# Altium PCB ISL6236A_DEMO_PCB_V1I1.PcbDoc (part 3 of 3)
Units mm, origin at the board's own origin, x right, y up, seen from the top; angles counter-clockwise.
Board outline 50 x 50 mm, 6 copper layers (L1, L2, L3, L4, L5, L6), stack 0.816 mm thick; 41 components, 27 nets, 119 pads, 41 vias.
Unrouted connection lines stored in the file: 91.
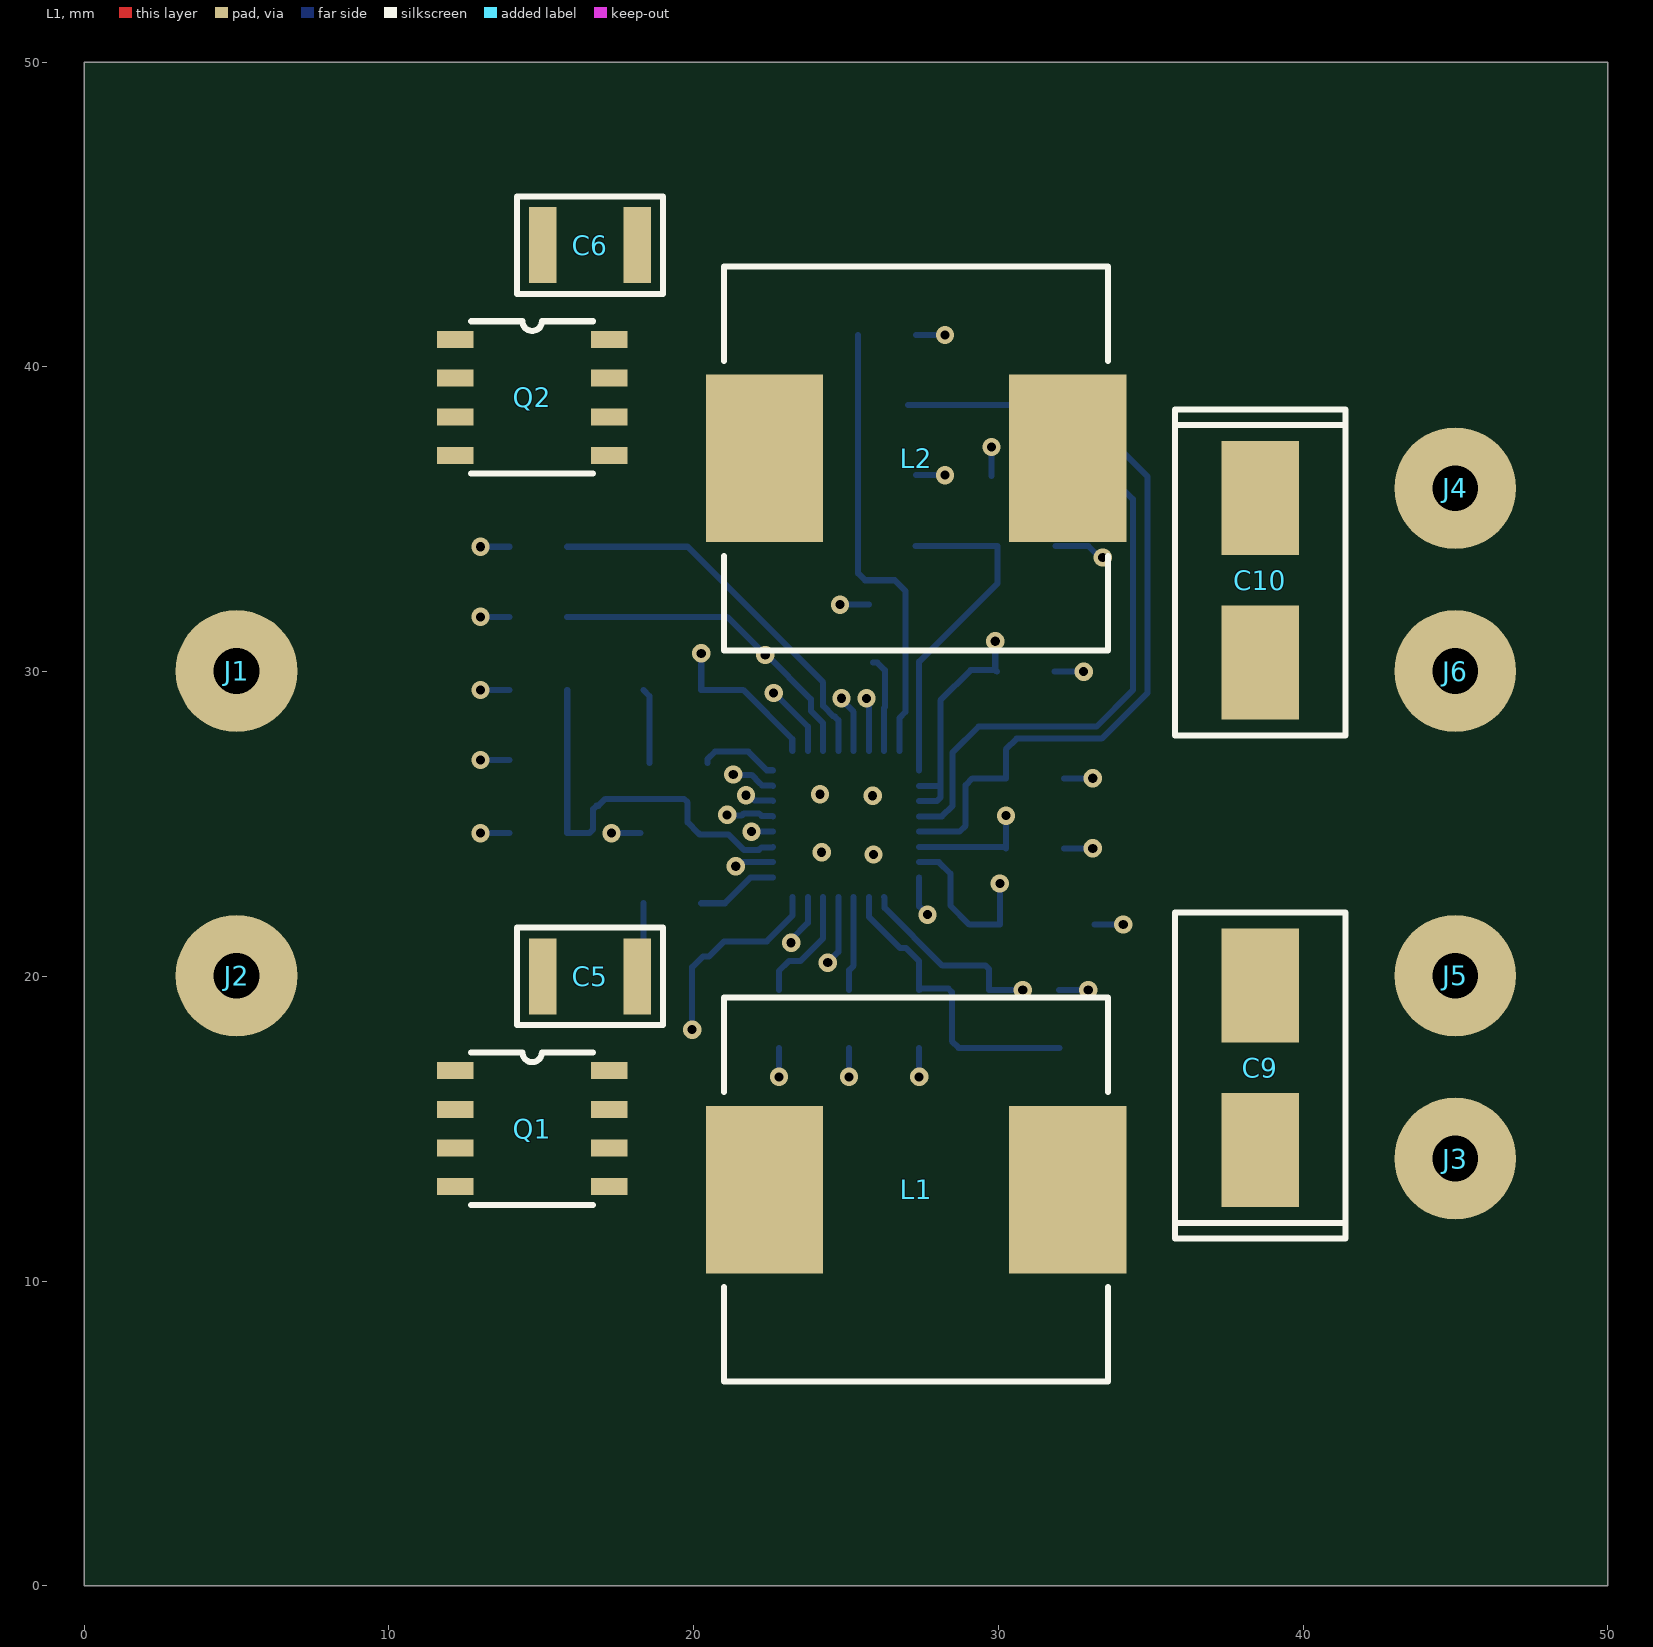
[diagram p0: L1 view]

## Via types
v1: diameter 0.6, hole 0.3, L1 to L6, tented both sides, 41 vias

## Nets (pads, with @x,y where several pads share a name; then routed paths per layer and width w, separated by ;. In a path a pad name is that pad's centre, name@x,y a point inside that pad or via, vN(x,y) a via of type N, cw(c..) or ccw(c..) an arc to the next point about the centre after c; other vN are vias at no path point) (continued)
+5V_VCC: (continued)
  L6 w0.2: v1(13,29.4) R3.2 ; v1(13,31.8) R10.2 ; v1(13,34.1) R9.2 ; v1(21.895,24.75) U1.20 ; v1(22.8,16.7) R11.2 ; R16.2 v1(28.25,36.45) ; v1(27.4,16.7) R13.2 ; U1.3 27.983,25.75 28.1,25.867 28.1,26.25 ; U1.2 28.1,26.25 ; R8.2 v1(29.775,37.375) ; v1(29.9,31) C4.1@29.9,30.05 ; C4.1 C4.1@29.9,30.05 ; 28.1,26.25 28.1,29.059 29.091,30.05 C4.1@29.9,30.05
+REF: C12.1 R14.2 U1.1 | length 11.1
  L6 w0.2: R14.2@27.275,34.125 C12.1 29.975,32.9 27.4,30.325 U1.1
+VIN: C2.1 C5.2 C6.2 J1.1 Q1.8 Q2.8 R2.1 U1.6 | length 4.9
  L6 w0.2: v1(13,27.1) R2.1 ; U1.6 30.2,24.25 C2.1 v1(30.25,25.275)
+VREF3: C11.1 R15.2 U1.5 | length 26.6
  L6 w0.2: R15.2@27.042,38.75 32.55,38.75 34.9,36.4 34.9,29.309 33.391,27.8 30.6,27.8 30.25,27.45 C11.1 29.15,26.5 28.925,26.275 28.925,24.95 28.725,24.75 U1.5
EN_1: R11.1 U1.14 | length 3.9
  L6 w0.2: R11.1 22.8,20.175 23.126,20.501 23.501,20.501 24.25,21.25 U1.14
EN_LDO: R8.1 U1.4 | length 19.3
  L6 w0.2: U1.4 28.15,25.25 28.5,25.6 28.5,27.35 29.35,28.2 33.225,28.2 34.417,29.392 34.417,35.658 33.375,36.7 31.925,36.7 31.675,36.45 R8.1
FB1: R12.1 R13.1 R17.2 U1.11 | length 10.2
  L6 w0.2: U1.11 25.75,21.95 26.775,20.925 26.975,20.925 27.4,20.5 R13.1 27.45,19.6 28.358,19.6 28.475,19.483 28.475,17.875 28.7,17.65 R12.1 R17.2
GND: C1.1 C2.2 C3.2 C4.2 C5.1 C6.1 C9.2 C10.2 C11.2 C12.2 J2.1 J5.1 J6.1 Q1.2 Q1.3 Q2.2 Q2.3 R6.2 R7.1 R17.1 R18.1 U1.8 U1.21 U1.22 U1.29 U1.33 | length 16
  L6 w0.2: v1(17.3,24.7) C3.2 ; v1(21.1,25.3) 21.124,25.276 21.573,25.276 21.647,25.35 22.144,25.35 22.229,25.265 22.585,25.265 U1.21 ; v1(21.717,25.942) 21.825,25.942 22.003,25.765 22.585,25.765 U1.22 ; v1(24.8,32.2) R6.2 ; v1(24.85,29.127) 24.85,29.079 25.25,28.679 U1.29 ; v1(25.1,16.7) R7.1 ; R18.1 v1(28.25,41.05) ; U1.8 27.4,22.3 v1(27.675,22.025) ; C4.2 v1(32.8,30) ; C12.2 32.951,34.125 33.326,33.75 v1(33.425,33.75) ; R17.1 v1(32.95,19.55) ; C2.2 v1(33.1,24.2) ; C11.2 v1(33.1,26.5) ; C1.1 v1(34.1,21.7)
  other v1: 25.9,24 24.2,24.075 25.875,25.925 24.15,25.975
LGATE1: Q1.4 U1.18 | length 1.3
  L6 w0.2: v1(21.381,23.612) 21.489,23.612 21.628,23.75 U1.18
LGATE2: Q2.4 U1.23 | length 1.5
  L6 w0.2: v1(21.3,26.625) 21.314,26.611 21.9,26.611 22.176,26.335 ; 22.177,26.335 22.247,26.265 22.585,26.265 U1.23
NetC7_2: C7.2 R4.1 | length 2.4
  L6 w0.2: C7.2 18.35,20.4 R4.1
NetC8_1: C8.1 R5.2 | length 2.5
  L6 w0.2: C8.1 18.55,29.2 R5.2
NetR4_2: R4.2 U1.17 | length 2.7
  L6 w0.2: R4.2 21.025,22.4 21.875,23.25 U1.17
NetR5_1: R5.1 U1.24 | length 2.6
  L6 w0.2: R5.1 20.45,27.124 20.7,27.374 21.791,27.374 22.4,26.765 22.585,26.765 U1.24
NetR6_1: R6.1 U1.31 | length 3.2
  L6 w0.2: R6.1@25.887,30.3 26.024,30.3 26.274,30.05 26.274,28.837 26.25,28.813 U1.31
NetR7_2: R7.2 U1.12 | length 3.1
  L6 w0.2: R7.2 25.1,20.2 25.25,20.35 U1.12
PHASE1: C7.1 L1.2 Q1.5 Q1.6 Q1.7 U1.16 | length 6.7
  L6 w0.2: v1(19.95,18.25) C7.1 19.95,20.3 20.3,20.65 20.5,20.65 21,21.15 22.4,21.15 23.25,22 U1.16
PHASE2: C8.2 L2.1 Q2.5 Q2.6 Q2.7 U1.25 | length 5.2
  L6 w0.2: v1(20.25,30.6) C8.2 21.625,29.4 23.235,27.79 23.235,27.415 U1.25
POK1: R10.1 U1.13 U1.27 | length 13.3
  L6 w0.2: R10.1 21.1,31.8 v1(22.35,30.55) 22.4,30.55 23.85,29.1 23.85,28.713 24.25,28.313 U1.27 ; v1(24.4,20.45) 24.75,20.8 U1.13
POK2: R9.1 U1.28 | length 12.7
  L6 w0.2: R9.1 19.8,34.1 24.25,29.65 24.25,29.266 24.25,28.879 24.601,28.527 24.633,28.527 24.75,28.41 U1.28
REFIN2: R14.1 R15.1 R16.1 R18.2 U1.32 | length 14.9
  L6 w0.2: R18.2 R14.1 25.4,33.225 25.625,33 26.6,33 26.95,32.65 26.95,28.676 26.75,28.476 U1.32
UGATE1: Q1.1 U1.15 | length 1.7
  L6 w0.2: v1(23.199,21.101) 23.199,21.209 23.75,21.76 U1.15
UGATE2: Q2.1 U1.26 | length 2.4
  L6 w0.2: v1(22.625,29.3) 22.65,29.3 23.75,28.2 U1.26
pads on no net: U1.9

## Polygon pours and split planes (outlines as drawn)
GND on L2 (split plane): 49.49,0.51 0.51,0.51 0.51,49.49 49.49,49.49
GND on L5 (split plane): 49.49,0.51 0.51,0.51 0.51,49.49 49.49,49.49